# EAGLE board PCB2D (EAGLE 9.7.0)
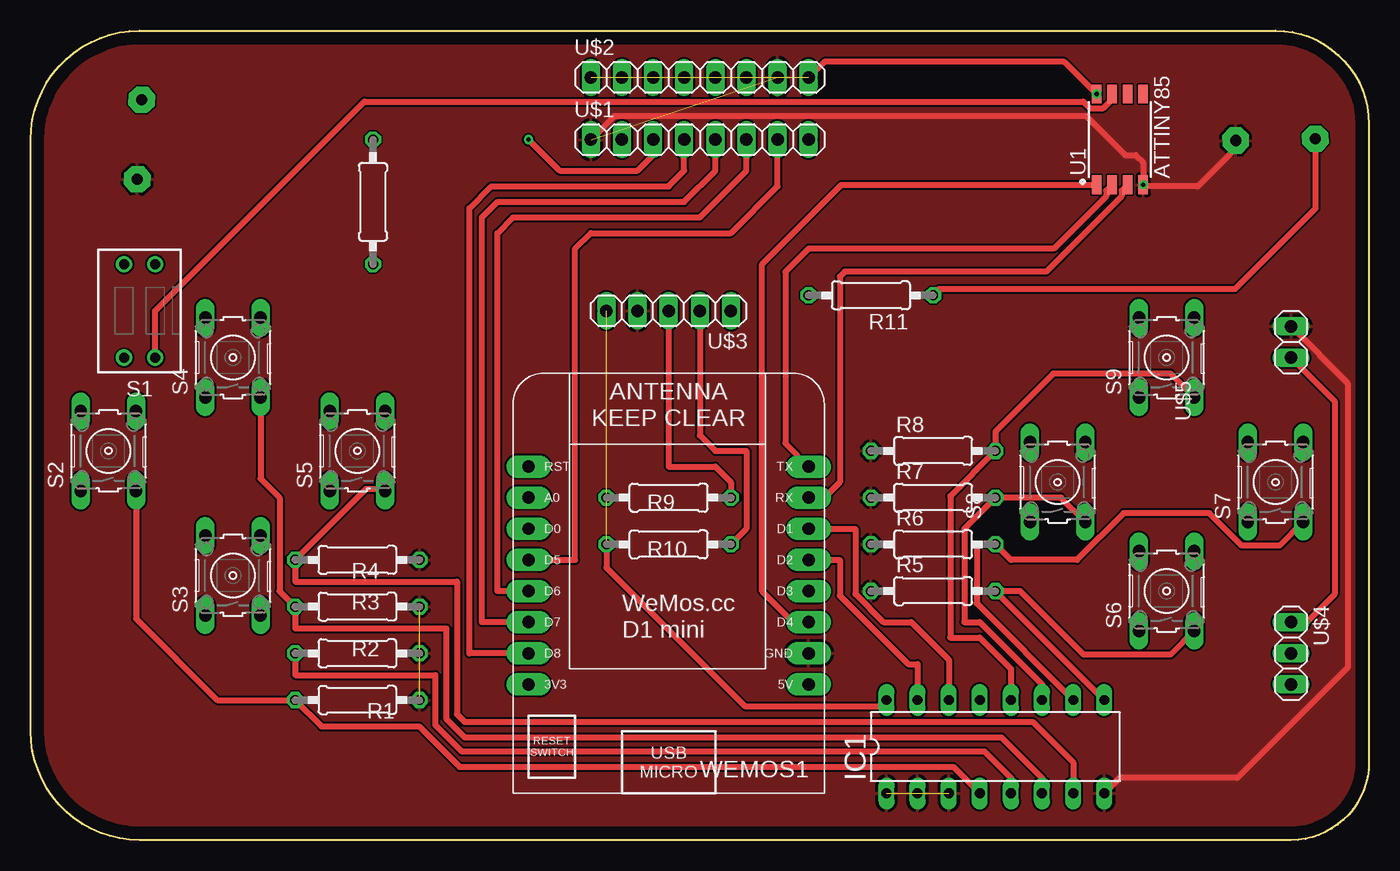
[diagram p0: board, top side]
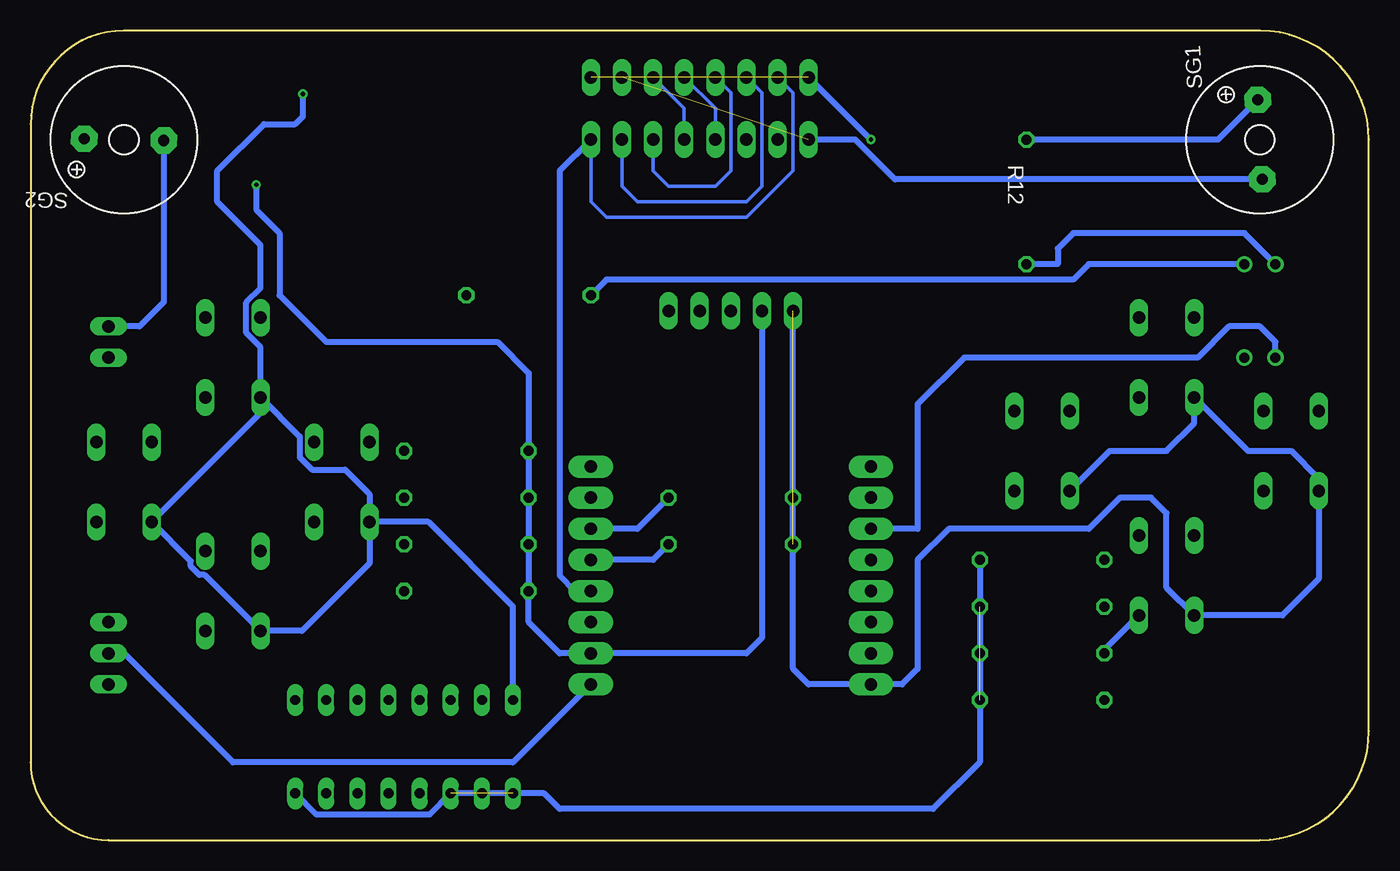
[diagram p1: board, bottom side, seen from below]

Size 109.22 x 66.04 mm. Coordinates in mm from the lower left corner, seen from the top.
Outline: 0,57.15 arc-90 8.89,66.04 101.6,66.04 arc-90 109.22,58.42 109.22,6.35 arc-90 102.87,0 8.89,0 arc-90 0,8.89 0,57.15
Copper layers (1*16): Top 0.035mm / dielectric 1.5mm / Bottom 0.035mm
Design rules "Fusion Electronics Design Rules": minimum track width 6mil, minimum drill 0.35mm, track to track 6mil, track to pad 6mil, pad to pad 6mil, via to via 6mil, smd to smd 6mil, copper to edge 40mil, drill to drill 6mil, minimum pad ring 10mil, minimum via ring 8mil, stop-mask expansion 4mil, vias tented up to drill 9999mil, thermal gap 10mil

## Footprints (pad centres in the part's own frame; a part is rotated, then mirrored left to right if it is on the bottom)
DIL16 = drill 0.813 long: 1 -8.89,-3.81; 2 -6.35,-3.81; 3 -3.81,-3.81; 4 -1.27,-3.81; 5 1.27,-3.81; 6 3.81,-3.81; 7 6.35,-3.81; 8 8.89,-3.81; 9 8.89,3.81; 10 6.35,3.81; 11 3.81,3.81; 12 1.27,3.81; 13 -1.27,3.81; 14 -3.81,3.81; 15 -6.35,3.81; 16 -8.89,3.81
0207/10 = drill 0.813 octagon: 1 -5.08,0; 2 5.08,0
DS-02 = drill 0.813: 1 -1.27,-3.81; 2 1.27,-3.81; 3 1.27,3.81; 4 -1.27,3.81
B3F-10XX = drill 1.016 long: 1 -3.251,2.261; 2 3.251,2.261; 3 -3.251,-2.261; 4 3.251,-2.261
F/QMBIII = drill 0.914 pad 2.159 octagon: + 3.251,0; - -3.251,0
ATTINY85 = smd 1.524 x 0.762: 1 -3.683,1.905; 2 -3.683,0.635; 3 -3.683,-0.635; 4 -3.683,-1.905; 5 3.727,-1.905; 6 3.727,-0.635; 7 3.727,0.635; 8 3.727,1.905
1X08 = drill 1.016 long: 1 -8.89,0; 2 -6.35,0; 3 -3.81,0; 4 -1.27,0; 5 1.27,0; 6 3.81,0; 7 6.35,0; 8 8.89,0
1X05 = drill 1.016 long: 1 -5.08,0; 2 -2.54,0; 3 0,0; 4 2.54,0; 5 5.08,0
1X03 = drill 1.016 long: 1 -2.54,0; 2 0,0; 3 2.54,0
1X02 = drill 1.016 long: 1 -1.27,0; 2 1.27,0
WEMOS-D1-MINI = drill 1.016 pad 1.829 long: 3V3 -10.16,-10.16; 5V 12.7,-10.16; A0 -10.16,5.08; D0 -10.16,2.54; D1 12.7,2.54; D2 12.7,0; D3 12.7,-2.54; D4 12.7,-5.08; D5 -10.16,0; D6 -10.16,-2.54; D7 -10.16,-5.08; D8 -10.16,-7.62; GND 12.7,-7.62; RESET -10.16,7.62; RX 12.7,5.08; TX 12.7,7.62

## Placement (x,y rotation side)
IC1  PCF8574P  [DIL16]  78.74,7.62 0 top
R1  [0207/10]  26.67,11.43 180 top
R2  [0207/10]  26.67,15.24 180 top
R3  [0207/10]  26.67,19.05 180 top
R4  [0207/10]  26.67,22.86 180 top
R5  [0207/10]  73.66,20.32 0 top
R6  [0207/10]  73.66,24.13 0 top
R7  [0207/10]  73.66,27.94 0 top
R8  [0207/10]  73.66,31.75 0 top
R9  [0207/10]  52.07,27.94 0 top
R10  [0207/10]  52.07,24.13 0 top
R11  [0207/10]  68.58,44.45 180 top
R12  [0207/10]  27.94,52.07 270 top
S1  DS02  [DS-02]  8.89,43.18 180 top
S2  [B3F-10XX]  6.35,31.75 90 top
S3  [B3F-10XX]  16.51,21.59 90 top
S4  [B3F-10XX]  16.51,39.37 90 top
S5  [B3F-10XX]  26.67,31.75 90 top
S6  [B3F-10XX]  92.71,20.32 90 top
S7  [B3F-10XX]  101.6,29.21 90 top
S8  [B3F-10XX]  83.82,29.21 90 top
S9  [B3F-10XX]  92.71,39.37 90 top
SG1  F/QMBIII  [F/QMBIII]  8.89,57.15 93.2 bottom
SG2  F/QMBIII  [F/QMBIII]  101.6,57.15 178.7 bottom
U1  ATTINY85  [ATTINY85]  88.9,57.15 90 top
U$1  PINHD-1X08_1X08M  [1X08]  54.61,57.15 0 top
U$2  PINHD-1X08_1X08M  [1X08]  54.61,62.23 0 top
U$3  PINHD-1X05_1X05M  [1X05]  52.07,43.18 180 top
U$4  PINHD-1X03_1X03M  [1X03]  102.87,15.24 270 top
U$5  PINHD-1X02_1X02M  [1X02]  102.87,40.64 90 top
WEMOS1  [WEMOS-D1-MINI]  50.8,22.86 0 top

## Library data of the parts
IC1 = micro-philips; MPN: PCF8574PN; OC_FARNELL: 204020; OC_NEWARK: 11N8515
R1-R12 = rcl; SPICEPREFIX: R
S1 = Switch; CATEGORY_L1: Switches; CATEGORY_L2: DIP Switches; CATEGORY_L3: SPST-NO; DATASHEET: https://www.farnell.com/datasheets/2925626.pdf; DESCRIPTION: DIP Switch Slide Type 2Pos SPST-NO Raised Actuator Red TH; MANUFACTURER: Multicomp Pro; MPN: MCNDS-02V; OPERATING_TEMPERATURE: -40°C ~ 85°C; PACKAGE: Through Hole; PACKAGE_SIZE: NA; PART_STATUS: Obsolete; ROHS: Compliant
S2-S9 = switch-omron; MPN: B3F-1000; OC_FARNELL: 176432; OC_NEWARK: 36M3542
SG1 SG2 = buzzer; OC_FARNELL: unknown; OC_NEWARK: unknown
U1 = SparkFun-IC-Microcontroller; PROD_ID: IC-09092
U$1-U$5 = Tinkercad
WEMOS1 = esp8266modules

## Nets
+3V3: IC1.16 R9.1 R10.1 S2.1 S3.1 S4.1 S5.1 S6.1 S7.1 S8.1 S9.1 U1.8 U$1.3 U$2.1 U$2.8 U$3.5 WEMOS1.3V3
+5V: U$4.2 WEMOS1.5V
ARS: U1.1 WEMOS1.D4
BZ1: S1.4 U1.7
BZ2: S1.3 WEMOS1.D0
CE: U$1.7 U$2.3 WEMOS1.D5
CLK: U$1.4 U$2.5 WEMOS1.D8
D/C: U$1.6 U$2.4 WEMOS1.D6
DIN: U$1.5 U$2.6 WEMOS1.D7
GND: IC1.1 IC1.2 IC1.3 IC1.8 R1.1 R2.1 R3.1 R4.1 R5.1 R6.1 R7.1 R8.1 SG1.- SG2.- U1.4 U$1.1 U$2.7 U$3.4 U$5.2 WEMOS1.GND
N$1: R11.2 S1.1
N$2: R12.2 S1.2
N$3: R11.1 SG2.+
N$4: R12.1 SG1.+
N$5: IC1.4 R1.2 S2.3
N$7: IC1.5 R2.2 S3.3
N$9: IC1.6 R3.2 S4.3
N$11: IC1.7 R4.2 S5.3
N$13: IC1.9 R5.2 S6.3
N$15: IC1.10 R6.2 S7.3
N$17: IC1.11 R7.2 S8.3
N$19: IC1.12 R8.2 S9.3
RST: U$1.8 U$2.2 WEMOS1.D3
RX1: U1.3 WEMOS1.RX
SCL: IC1.14 R9.2 U$3.3 WEMOS1.D1
SDA: IC1.15 R10.2 U$3.2 WEMOS1.D2
TX1: U1.2 WEMOS1.TX
VCC: U$4.1 U$5.1

## Tracks (layer width: path | path; a pad name or v marks a point on that pad's centre or on a via)
+3V3  (via drill 0.35)  (3 unrouted)
  Top 0.508: R10.1 46.99,22.22 58.29,10.92 69.34,10.92 IC1.16 | v40.64,57.15 43.18,54.61 49.53,54.61 50.8,55.88 U$1.3 | U1.8 84.37,63.5 64.77,63.5 U$2.8
  Bottom 0.508: S5.1 21.16,31.75 16.51,31.75 14.25,34.01 S4.1 9.88,31.75 6.35,31.75 4.09,29.49 S2.1 4.09,21.31 7.06,18.34 S3.1 16.51,20.6 16.51,26.67 17.78,27.94 20.32,27.94 22.86,25.4 34.29,25.4 36.83,22.86 36.83,13.97 38.1,12.7 WEMOS1.3V3 45.72,12.7 46.99,13.97 U$3.5 | S8.1 81.56,28.22 83.57,30.23 86.26,30.23 87.25,31.22 87.25,32.92 S9.1 | S8.1 81.56,22.58 87.07,17.07 S6.1 95.02,21.64 95.45,21.64 96.14,22.32 96.14,22.76 S7.1 90.45,34.85 S9.1 | S9.1 90.45,40.21 91.62,41.38 91.62,43.87 90.45,45.04 90.45,48.54 93.98,52.07 93.98,54.61 90.17,58.42 87.63,58.42 86.99,59.05 U1.8 | IC1.16 69.85,19.05 76.76,25.96 S8.1 | U$2.1 v40.64,57.15
  other vias: 86.99,60.88
+5V
  Bottom 0.508: WEMOS1.5V 69.85,6.35 92.71,6.35 101.6,15.24 U$4.2
ARS
  Top 0.508: U1.1 66.17,53.47 59.69,46.99 59.69,20.32 62.23,17.78 WEMOS1.D4
BZ1
  Top 0.508: S1.4 10.16,43.18 27.23,60.25 85.91,60.25 86.45,59.71 87.54,59.71 88.27,60.43 U1.7
BZ2
  Bottom 0.508: S1.3 7.62,40.64 8.89,41.91 11.43,41.91 13.97,39.37 33.02,39.37 36.83,35.56 36.83,25.4 WEMOS1.D0
CE
  Top 0.508: WEMOS1.D5 44.45,22.86 44.45,48.26 45.72,49.53 57.15,49.53 60.96,53.34 U$1.7
  Bottom 0.305: U$2.3 49.53,60.96 49.53,53.34 50.8,52.07 59.69,52.07 60.96,53.34 U$1.7
CLK
  Top 0.508: WEMOS1.D8 35.81,15.24 35.81,51.56 37.59,53.34 52.07,53.34 53.34,54.61 U$1.4
  Bottom 0.305: U$2.5 53.34,59.69 U$1.4
D/C
  Top 0.508: WEMOS1.D6 38.1,20.32 38.1,49.53 39.37,50.8 54.61,50.8 58.42,54.61 U$1.6
  Bottom 0.305: U$2.4 52.07,60.96 52.07,54.61 53.34,53.34 57.15,53.34 58.42,54.61 U$1.6
DIN
  Top 0.508: WEMOS1.D7 36.83,17.78 36.83,50.8 38.1,52.07 53.34,52.07 55.88,54.61 U$1.5
  Bottom 0.305: U$2.6 55.88,59.69 U$1.5
GND  (via drill 0.35)  (5 unrouted)
  Top 0.508: SG2.- 98.35,56.44 95.25,53.34 90.93,53.34 U1.4 90.8,55.25 90.17,55.88 89.34,55.88 86.14,59.08 47.65,59.08 U$1.1 | U$5.2 107.49,37.29 107.49,14.1 98.48,5.08 88.9,5.08 IC1.8
  Bottom 0.508: SG1.- 38.66,53.9 41.91,57.15 U$1.1 | R4.1 R1.1 31.75,6.35 35.56,2.54 66.04,2.54 67.31,3.81 IC1.3 76.66,2.08 85.9,2.08 IC1.8 | U$3.4 49.53,16.51 50.8,15.24 WEMOS1.GND 66.04,15.24 68.58,17.78 R5.1 R6.1 R7.1 R8.1 68.58,38.1 71.12,40.64 85.09,40.64 88.9,44.45 88.9,49.53 90.8,51.44 U1.4 | SG2.- 98.35,43.89 100.33,41.91 U$5.2
  other vias: 90.8,53.47 87.63,3.81
  pour Top: 8.89,0.08 102.87,0.08 103.63,0.12 104.37,0.26 105.09,0.48 105.79,0.79 106.43,1.19 107.03,1.65 107.57,2.19 108.03,2.79 108.43,3.43 108.74,4.13 108.96,4.85 109.1,5.59 109.14,6.35 109.14,58.42 109.1,59.26 108.95,60.1 108.72,60.91 108.4,61.69 107.99,62.43 107.5,63.12 106.93,63.75 106.3,64.32 105.61,64.81 104.87,65.22 104.09,65.54 103.28,65.77 102.44,65.92 101.6,65.96 8.89,65.96 7.9,65.91 6.93,65.74 5.98,65.47 5.07,65.09 4.2,64.61 3.39,64.04 2.66,63.38 2,62.65 1.43,61.84 0.95,60.97 0.57,60.06 0.3,59.11 0.13,58.14 0.08,57.15 0.08,8.89 0.13,7.9 0.3,6.93 0.57,5.98 0.95,5.07 1.43,4.2 2,3.39 2.66,2.66 3.39,2 4.2,1.43 5.07,0.95 5.98,0.57 6.93,0.3 7.9,0.13
N$1
  Bottom 0.508: S1.1 22.86,46.99 24.13,45.72 62.23,45.72 R11.2
N$2
  Bottom 0.508: S1.2 10.16,49.53 24.13,49.53 25.4,48.26 25.4,46.99 R12.2
N$3
  Top 0.508: SG2.+ 104.85,51.51 98.3,44.96 74.17,44.96 R11.1
N$4
  Bottom 0.508: SG1.+ 12.32,57.15 R12.1
N$5
  Top 0.508: S2.3 8.61,18.06 15.24,11.43 R1.2 23.75,9.27 31.71,9.27 35.01,5.97 75.31,5.97 IC1.4
N$7
  Top 0.508: R2.2 21.59,13.46 33.02,13.46 33.02,9.4 35.18,7.24 77.85,7.24 80.01,5.08 IC1.5
  Bottom 0.508: S3.3 21.59,15.52 R2.2
N$9
  Top 0.508: S4.3 18.77,29.49 20.32,27.94 20.32,20.32 R3.2 21.59,17.27 33.91,17.27 33.91,9.91 35.43,8.38 79.25,8.38 82.55,5.08 IC1.6
N$11
  Top 0.508: S5.3 28.8,28.63 27.36,28.63 R4.2 21.59,21.08 34.8,21.08 34.8,10.29 35.43,9.65 81.79,9.65 85.09,6.35 IC1.7
N$13
  Top 0.508: IC1.9 R5.2 80.77,20.32 85.95,15.14 93.04,15.14 S6.3
N$15
  Top 0.508: IC1.10 77.22,19.3 77.22,24.13 R6.2 80.01,22.86 85.4,22.86 89.21,26.67 96.21,26.67 98.86,24.03 101.93,24.03 S7.3
N$17
  Top 0.508: S8.3 84.1,27.94 R7.2 76.2,25.4 76.2,17.78 77.47,17.78 82.55,12.7 IC1.11
N$19
  Top 0.508: S9.3 93.04,38.05 83.46,38.05 78.74,33.33 R8.2 75.06,28.07 75.06,16.51 77.47,16.51 80.01,13.97 IC1.12
RST
  Bottom 0.305: U$2.2 46.99,60.96 46.99,54.61 50.8,50.8 62.23,50.8 63.5,52.07 U$1.8
  Bottom 0.508: U$1.8 66.04,54.61 66.04,21.59 64.77,20.32 WEMOS1.D3
RX1
  Top 0.508: U1.3 89.05,52.98 89.05,52.54 82.9,46.38 66.45,46.38 66.04,45.97 66.04,29.21 64.77,27.94 WEMOS1.RX
SCL
  Top 0.508: U$3.3 52.07,30.48 55.88,30.48 57.15,29.21 R9.2 | WEMOS1.D1 67.31,25.4 67.31,20.08 69.61,17.78 71.88,17.78 74.93,14.73 IC1.14
  Bottom 0.508: R9.2 59.69,25.4 WEMOS1.D1
SDA
  Top 0.508: U$3.2 54.61,33.02 55.88,31.75 58.42,31.75 58.42,25.4 R10.2 | WEMOS1.D2 66.04,22.86 66.04,19.94 71.63,14.35 72.39,14.35 IC1.15
  Bottom 0.508: R10.2 58.42,22.86 WEMOS1.D2
TX1
  Top 0.508: U1.2 87.78,52.98 87.78,52.54 83.51,48.26 63.5,48.26 61.59,46.36 61.59,32.38 WEMOS1.TX
VCC
  Top 0.508: U$5.1 106.43,35.81 106.43,20.07 104.14,17.78 U$4.1